# Altium PCB ASCII-v1.1.PcbDoc (part 1 of 2)
Units mil, origin at the board's own origin, x right, y up, seen from the top; angles counter-clockwise.
Board outline 1175 x 6265 mil, 2 copper layers (Top Layer, Bottom Layer), stack 61.811 mil thick; 67 components, 48 nets, 292 pads, 122 vias.
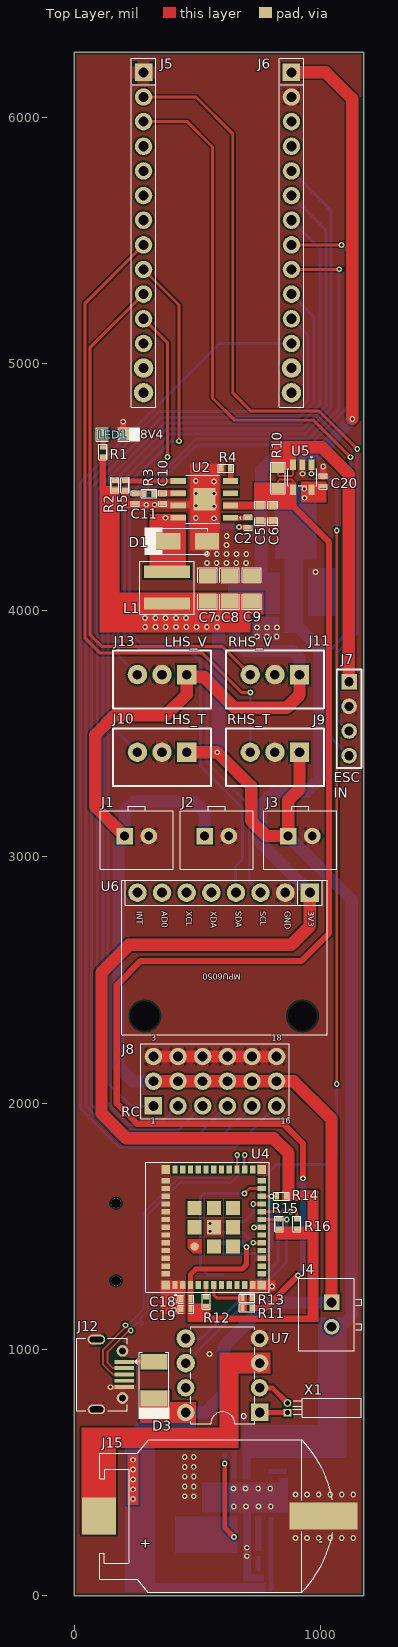
[diagram p0: Top Layer view]
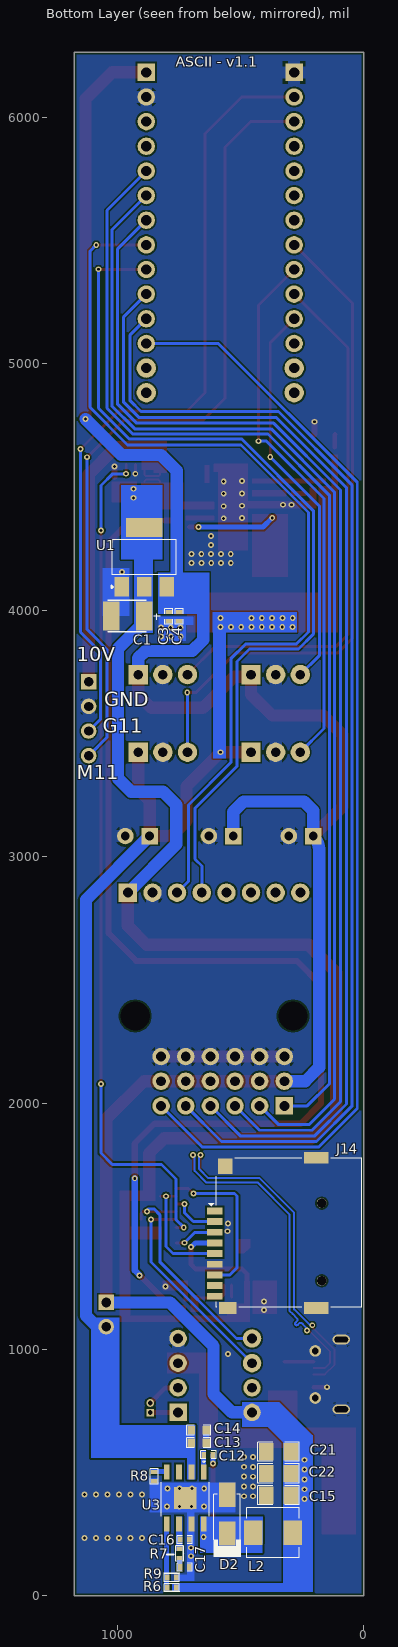
[diagram p1: Bottom Layer view, seen from below]
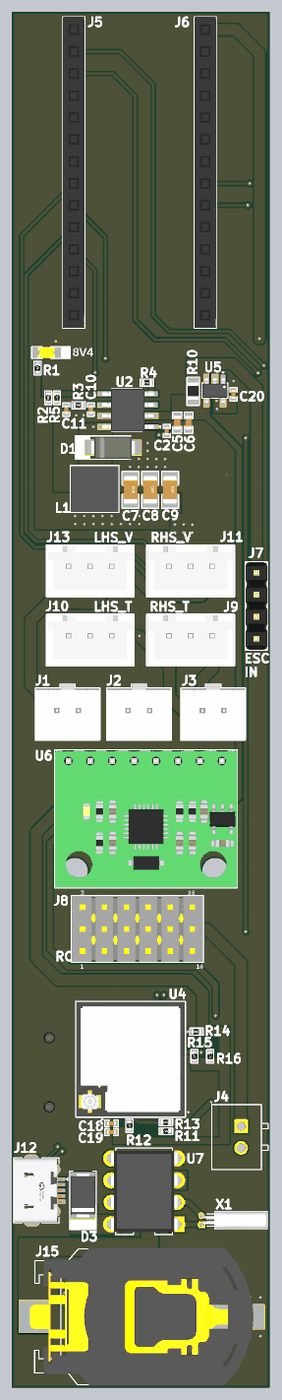
[diagram p2: 3D render of the assembled board from above, using the file's embedded part models]
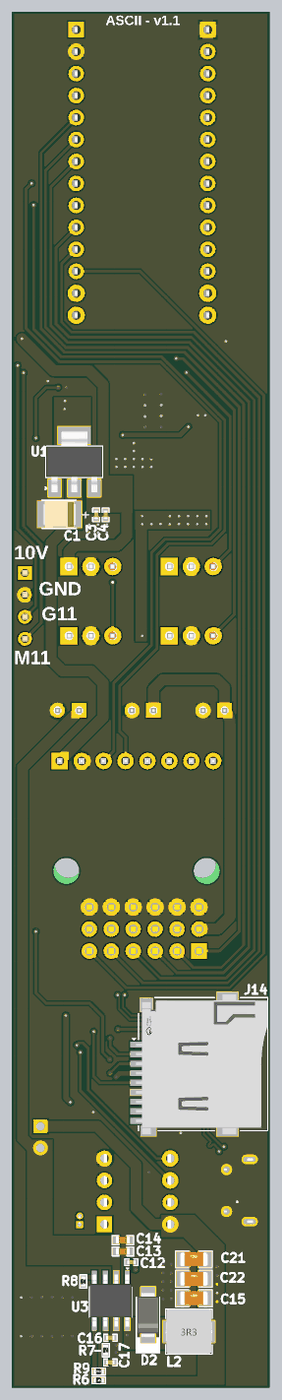
[diagram p3: 3D render of the assembled board from below, using the file's embedded part models]

## Layer stack, top to bottom
Top Solder: solder mask 0.3937, Solder Resist, Dk 3.5
Top Layer: signal copper 1.378
Dielectric 1: core 59.0551, FR-4, Dk 4.8
Bottom Layer: signal copper 1.378
Bottom Solder: solder mask 0.3937, Solder Resist, Dk 3.5

## Board outline
0,5005 0,6265 1175,6265 1175,0 0,0

## Design rules (kind name [scope] priority, off if disabled: settings)
BoardOutlineClearance [All] p1: gap=0 ignorepadtopadclearanceinfootprint=FALSE except(10: Poly-OutlineEdge)
Clearance [All] p1: gap=7 ignorepadtopadclearanceinfootprint=FALSE except(0: Arc-Hole Track-Hole SMDPad-Hole THPad-Hole Via-Hole Fill-Hole Poly-Hole Region-Hole Text-Hole; 4: Arc-SMDPad Track-SMDPad SMDPad-SMDPad)
DiffPairsRouting [InDifferentialPairClass('USB_PROGRAM_LINES')] p1: maxlimit=10 minlimit=10 mostfreqgap=10 toplayer_minwidth=8 toplayer_maxwidth=8 toplayer_prefwidth=8 bottomlayer_minwidth=8 bottomlayer_maxwidth=8 bottomlayer_prefwidth=8 impedanceprofiledriven=TRUE impedanceprofileid={82D3349C-C058-4513-A408-416EB23D566D} impedanceprofilevalue=90.000000 maxuncoupledlength=500
HoleSize [All] p1: absolutevalues=TRUE maxlimit=1000 minlimit=1 maxpercent=80.000 minpercent=20.000
HoleToHoleClearance [All] p1: gap=0 allowstackedmicrovias=TRUE
MatchedLengths "Schematic Matched Net Lengths" [InNetClass('USB_PROGRAM')] p1: tolerance=50 checknetsindiffpair=TRUE checkdiffpairvsdiffpair=FALSE checkxsignals=FALSE checkothers=FALSE
MaxMinImpedance "Schematic Impedance Constraint" [InNetClass('USB_PROGRAM')] p1: minimum=85.00 maximum=90.00
MinimumSolderMaskSliver [All] p1: minsoldermaskwidth=0
PolygonConnect [All] p1: thpad.connectstyle=Relief thpad.reliefconductorwidth=50 thpad.reliefentries=4 thpad.polygonreliefangle="90 Angle" thpad.airgapwidth=10 smdpad.connectstyle=Direct smdpad.reliefconductorwidth=50 smdpad.reliefentries=4 smdpad.polygonreliefangle="90 Angle" smdpad.airgapwidth=10 via.connectstyle=Direct via.reliefconductorwidth=50 via.reliefentries=4 via.polygonreliefangle="90 Angle" via.airgapwidth=10
RoutingVias [All] p1: holewidth=11.81 width=23.62 viastyle="Through Hole" minholewidth=11.81 minwidth=23.62 maxholewidth=11.81 maxwidth=23.62
SilkToSilkClearance [All] p1: silktosilkclearance=0
SilkToSolderMaskClearance [IsPad] p1: minsilkscreentomaskgap=0 clearancetoexposedcopper=TRUE
SolderMaskExpansion [All] p1: expansion=4 istentingtop=FALSE
UnRoutedNet [All] p1: checkbadconnections=TRUE
Width [All] p1: maxlimit=100 minlimit=8 preferedwidth=22
23 further rules are at their usual default settings.

## Classes and differential pairs
differential pair class USB_PROGRAM_LINES: USB_D
net class USB_PROGRAM: USB_D_N USB_D_P
component class Power_Section: C1 C2 C3 C4 C5 C6 C7 C8 C9 C10 C11 C12 C13 C14 C15 C16 C17 C21 C22 D1 D2 J1 J2 J3 J4 L1 L2 LED1 R1 R2 R3 R4 R5 R6 R7 R8 R9 U1 U2 U3
component class Controller_Section: C18 C19 C20 D3 J5 J6 J7 J8 J9 J10 J11 J12 J13 J14 J15 R10 R11 R12 R13 R14 R15 R16 U4 U5 U6 U7 X1
differential pair USB_D: +USB_D_P -USB_D_N

## Components (designator, comment, footprint, x,y, rotation, side; value= is the part's Value field where it differs from the comment)
C1 "22uF" Case-B 957.85,3976.7 r0 bottom locked
C2 "0.1uF" Cap-0402 706,4356 r90 top
C3 "22uF" Cap-0402 790.92,3974.2 r90 bottom locked
C4 "0.1uF" Cap-0402 747.92,3974.2 r90 bottom locked
C5 "4.7uF" Cap-0603 754,4394 r90 top
C6 "4.7uF" Cap-0603 806,4394 r90 top
C7 "47uF" Cap-1206 541,4088 r270 top
C8 "47uF" Cap-1206 631,4088 r270 top
C9 "47uF" Cap-1206 721,4088 r270 top
C10 "6.8pF" Cap-0402 360,4453 r90 top
C11 "5.6nF" Cap-0402 248,4453 r90 top
C12 "0.1uF" Cap-0402 630,572.32 r0 bottom
C13 "4.7uF" Cap-0603 669,621.32 r0 bottom
C14 "4.7uF" Cap-0603 669,672.32 r0 bottom
C15 "47uF" Cap-1206 345,408.32 r180 bottom
C16 "8.2pF" Cap-0402 726,228.32 r0 bottom
C17 "1.8nF" Cap-0402 726,116.32 r0 bottom
C18 "0.1uF" Cap-0402 453.92,1203.7 r180 top locked
C19 "10uF" Cap-0402 453.92,1163.7 r180 top locked
C20 "0.1uF" Cap-0402 1010.92,4522.7 r270 top locked
C21 "47uF" Cap-1206 345,585.32 r180 bottom
C22 "47uF" Cap-1206 345,496.82 r180 bottom
D1 "SS56" SMA 460.74,4280 r0 top
D2 "SS56" SMA 554,332.06 r90 bottom
D3 "SS34-MS" SMA(DO-214AC) 323.92,875.9 r90 top locked
J1 "2.54-2P ZZDK" "2.54-2P ZZDK" 254.12,3083.7 r0 top locked
J2 "2.54-2P ZZDK" "2.54-2P ZZDK" 578.71,3083.7 r0 top locked
J3 "2.54-2P ZZDK" "2.54-2P ZZDK" 917.71,3083.7 r0 top locked
J4 "B2B-XH-2(LF)(SN)" B2B-XH-2(LF)(SN) 1044.92,1141.7 r270 top locked
J5 "PM254-1-14-Z-8.5" "HDR 1x14 TH (Female)" 281.92,5532.7 r270 top locked
J6 "PM254-1-14-Z-8.5" "HDR 1x14 TH (Female)" 881.94,5532.7 r270 top locked
J7 "X6511WV-04H-C60D30" HDR1X4_ 1115.92,3709.7 r270 top locked
J8 "TSW-106-07-T-T" TSW-106-07-T-T 571.92,2088.7 r0 top locked
J9 "B3B-XH-A(LF)(SN)" B3B-XH-A(LF)(SN)_ 764.91,3423.7 r180 top locked
J10 "B3B-XH-A(LF)(SN)" B3B-XH-A(LF)(SN)_ 306.92,3423.7 r180 top locked
J11 "B3B-XH-A(LF)(SN)" B3B-XH-A(LF)(SN)_ 764.91,3738.7 r180 top locked
J12 "HX MICRO XNJ JB" "HX MICRO XNJ JB" 146.92,898.7 r270 top locked
J13 "B3B-XH-A(LF)(SN)" B3B-XH-A(LF)(SN)_ 306.92,3738.7 r180 top locked
J14 "HX TF-CARD H1.8" "HX TF-CARD H1.8" 386.92,1473.7 r90 bottom locked
J15 "BS-CR2032-8" BS-CR2032-8 556.92,323.7 r180 top locked
L1 "8.2nH" YSPIT0550A-8R2M 377,4092.02 r270 top
L2 "2.2uH" PSPMAA0503-2R2M-ANP 368,256.32 r180 bottom
LED1 "150080BS75000" LED-0805 157.92,4712.7 r0 top
R1 "1K" Res-0402 117,4642 r90 top
R2 "115K" Res-0402 166,4507 r270 top
R3 "28.7K" Res-0402 304,4473 r180 top
R4 "105K" Res-0402 616,4576 r0 top
R5 "12.1k" Res-0402 206,4507 r90 top
R6 "60.4K" Res-0402 779,34.32 r180 bottom
R7 "23.7K" Res-0402 747,172.32 r90 bottom
R8 "80.6K" Res-0402 850,484.32 r90 bottom
R9 "11.5K" Res-0402 779,74.32 r0 bottom
R10 "6mR" RES-0805 826.92,4536.7 r90 top locked
R11 "10K" Res-0402 701.92,1168.7 r180 top locked
R12 "10K" Res-0402 535.92,1193.7 r90 top locked
R13 "2K" Res-0402 701.92,1208.7 r180 top locked
R14 "10K" Res-0402 841.92,1621.7 r0 top locked
R15 "10K" Res-0402 831.92,1509.2 r270 top locked
R16 "10K" Res-0402 903.92,1509.2 r270 top locked
U1 "AMS1117-3.3" "SOT- 223" 890.37,4215.78 r180 bottom locked
U2 "TPS54560DDAR" "8-SO PowerPad" 529,4450 r180 top
U3 "TPS54560DDAR" "8-SO PowerPad" 724,397.32 r270 bottom
U4 "ESP32-C3-MINI-1U-H4" ESP32-C3-MINI-1U-H4. 566.92,1495.95 r90 top locked
U5 "ZXCT1086E5TA" SOT-23-5 925.92,4539.7 r270 top locked
U6 "MPU6050 MODULE" MPU6050_ 606.92,2603.7 r180 top locked
U7 "DS1307N" 8-PDIP 602.92,894.7 r180 top locked
X1 "32.768KHz" DT-26 865.92,763.39 r180 top locked

## Footprints (in the part's own frame and the unit in brackets; to place one, negate y for a bottom-side part, rotate by r counter-clockwise, add the part's x,y. Pads: shape width x height; smd on the part's side, far side on the other; paste and mask are expansions set on the pad)
"2.54-2P ZZDK" [mm]
  rect 1.7x1.7 hole 0.9 paste+0 mask+0.051: 1(-1.25,0)
  round 1.7 hole 0.9 paste+0 mask+0.051: 2(1.25,0)
  silkscreen extent -3.75,-3.43 3.75,3.05, body extent -3.75,-3.39 3.75,2.96, height 7
8-PDIP [mm]
  rect 1.8x1.8 hole 1 paste+0 mask+0.051: 1(-3.81,3.81)
  round 1.8 hole 1 paste+0 mask+0.051: 2(-3.81,1.27) 3(-3.81,-1.27) 4(-3.81,-3.81) 7(3.81,1.27) 8(3.81,3.81)
  round 1.905 hole 1 paste+0 mask+0.051: 5(3.81,-3.81) 6(3.81,-1.27)
  silkscreen extent -3.3,-5 3.3,5, body extent -3.92,-4.69 3.92,4.69, height 4.57
"8-SO PowerPad" [mm]
  rect 1.55x0.6 smd mask+0.07: 1(-2.7,1.905) 2(-2.7,0.635) 3(-2.7,-0.635) 4(-2.7,-1.905) 5(2.7,-1.905) 6(2.7,-0.635) 7(2.7,0.635) 8(2.7,1.905)
  rect 2.287x2.287 smd mask+0.07: 9(0,0)
  silkscreen extent -3.76,-2.49 1.9,2.49, body extent -3,-2.45 3,2.45, height 1.7
B2B-XH-2(LF)(SN) [mm]
  rect 1.6x1.6 hole 1 paste+0 mask+0.051: 1(-1.25,0)
  round 1.6 hole 1 paste+0 mask+0.051: 2(1.25,0)
  silkscreen extent -3.75,-3.4 3.74,3.13
B3B-XH-A(LF)(SN)_ [mm]
  rect 2x2 hole 1: 1(-3.81,0)
  round 2 hole 1: 2(-1.27,0) 3(1.27,0)
  silkscreen extent -6.32,-2.46 3.78,3.48, body extent -6.22,-2.36 3.68,3.39, height 7
BS-CR2032-8 [mm]
  rect 7x2.8 smd: 1(-11.575,0)
  rect 3.5x3.8 smd: 2(11.575,0)
  silkscreen extent -12.52,-7.85 11.52,7.85, body extent -13.83,-7.95 12.07,7.95, height 5.41
Cap-0402 [mil]
  rect 18x25 smd mask+2.36: 1(-18.5,0) 2(18.5,0)
  silkscreen extent -31,-16 31,16, body extent -20,-10 20,10, height 19
Cap-0603 [mil]
  rect 30x35 smd mask+2.36: 1(-30,0) 2(30,0)
  silkscreen extent -49,-21 49,21, body extent -32,-16 31,16, height 34
Cap-1206 [mil] "SMD 1206"
  rect 60x70 smd: 1(-50,0) 2(50,0)
  silkscreen extent -84,-39 84,39, body extent -63,-31 63,32, height 39
Case-B [mm]
  rect 1.7x3 smd paste+0: 1(-1.7,0) 2(1.7,0)
  silkscreen extent -3.35,-1.63 2.03,1.63, body extent -1.85,-1.5 1.85,1.5, height 2.16
DT-26 [mm]
  rect 0.8x0.8 hole 0.5 paste+0 mask+0.051: 1(0,0.5)
  round 0.8 hole 0.5 paste+0 mask+0.051: 2(0,-0.5)
  silkscreen extent -7.6,-1 -0.54,1, body extent -7.51,-0.99 0.11,0.99, height 2.02
ESP32-C3-MINI-1U-H4. [mm]
  rect 0.85x0.55 smd paste+0 mask+0.05: 1(-5.95,4) 2(-5.95,3.2) 3(-5.95,2.4) 4(-5.95,1.6) 5(-5.95,0.8) 6(-5.95,0) 7(-5.95,-0.8) 8(-5.95,-1.6) 9(-5.95,-2.4) 10(-5.95,-3.2) 11(-5.95,-4) 25(5.95,-4) 26(5.95,-3.2) 27(5.95,-2.4) 28(5.95,-1.6) 29(5.95,-0.8) 30(5.95,0) 31(5.95,0.8) 32(5.95,1.6) 33(5.95,2.4) 34(5.95,3.2) 35(5.95,4)
  rect 0.55x0.85 smd paste+0 mask+0.05: 12(-4.8,-4.95) 13(-4,-4.95) 14(-3.2,-4.95) 15(-2.4,-4.95) 16(-1.6,-4.95) 17(-0.8,-4.95) 18(0,-4.95) 19(0.8,-4.95) 20(1.6,-4.95) 21(2.4,-4.95) 22(3.2,-4.95) 23(4,-4.95) 24(4.8,-4.95) 36(4.8,4.95) 37(4,4.95) 38(3.2,4.95) 39(2.4,4.95) 40(1.6,4.95) 41(0.8,4.95) 42(0,4.95) 43(-0.8,4.95) 44(-1.6,4.95) 45(-2.4,4.95) 46(-3.2,4.95) 47(-4,4.95) 48(-4.8,4.95)
  rect 1.45x1.45 smd paste+0 mask+0.05: 49(0,0) 54(-1.975,0) 56(0,1.975) 57(1.975,1.975) 58(1.975,0) 59(-1.975,-1.975) 60(0,-1.975) 61(1.975,-1.975)
  rect 0.9x0.9 smd paste+0 mask+0.05: 50(5.95,4.95) 51(5.95,-4.95) 52(-5.95,-4.95) 53(-5.95,4.95)
  round 0.87 smd: 55(-1.975,1.975)
  Top Layer region: -2.7,2.1 -2.1,2.7 -1.25,2.7 -1.25,1.25 -2.7,1.25 -2.7,2.1
  silkscreen extent -6.98,-5.7 6.7,7, body extent -6.6,-5.59 6.6,6.91, height 2.4
HDR1X4_ [mm] "Connector; Header; 4 Position"
  rect 1.6x1.6 hole 0.95: 1(0,0)
  round 1.6 hole 0.95: 2(2.54,0) 3(5.08,0) 4(7.62,0)
  silkscreen extent -1.27,-1.27 8.89,1.27, body extent -1.27,-1.27 8.89,1.27, height 9.5
"HDR 1x14 TH (Female)" [mm]
  rect 1.8x1.8 hole 1.05 paste+0 mask+0.051: 1(-16.51,0)
  round 1.8 hole 1.05 paste+0 mask+0.051: 2(-13.97,0) 3(-11.43,0) 4(-8.89,0) 5(-6.35,0) 6(-3.81,0) 7(-1.27,0) 8(1.27,0) 9(3.81,0) 10(6.35,0) 11(8.89,0) 12(11.43,0)
  round 2 hole 1.05 paste+0 mask+0.051: 13(13.97,0) 14(16.51,0)
  silkscreen extent -17.99,-1.27 17.99,1.27, body extent -17.99,-1.25 17.98,1.25, height 8.8
"HX MICRO XNJ JB" [mm]
  rect 0.4x2 smd paste-100 mask+0.05: 1(-1.3,1.428) 2(-0.65,1.428) 3(0,1.428) 4(0.65,1.428) 5(1.3,1.428)
  oval 1x1.8 hole 0.6 slot 1.4 at 90 deg paste+0 mask+0.05: S1(-3.6,-1.428) S2(3.6,-1.428)
  round 1.2 hole 0.7 paste+0 mask+0.05: S3(2.425,1.252) S4(-2.425,1.252)
  silkscreen extent -3.75,-3.53 3.75,2.79, body extent -3.75,-3.49 3.75,2.07, height 2.57
"HX TF-CARD H1.8" [mm]
  rect 0.7x1.6 smd paste+0 mask+0.05: 1(2.25,5.5) 2(1.15,5.5) 3(0.05,5.5) 4(-1.05,5.5) 5(-2.15,5.5) 6(-3.25,5.5) 7(-4.35,5.5) 8(-5.45,5.5) 9(-6.55,5.5)
  rect 1.2x1.8 smd paste+0 mask+0.05: MP1(-7.75,4.2)
  rect 1.2x2.5 smd paste+0 mask+0.05: MP2(-7.75,-4.95) MP3(7.75,-4.95)
  rect 1.6x1.5 smd paste+0 mask+0.05: MP4(6.85,4.45)
  round 1 hole 1 unplated paste+0: ""(-4.95,-5.5) ""(3.05,-5.5)
  silkscreen extent -7.7,-9.62 7.7,6.18, body extent -8.07,-9.56 8.08,5.64, height 2.06
LED-0805 [mm]
  rect 1.2x1.2 smd: 1(-1.05,0) 2(1.05,0)
  silkscreen extent -1.73,-0.74 2.79,0.74, body extent -1,-0.62 1,0.63, height 1.1
MPU6050_ [mm]
  rect 1.9x1.9 hole 1.021 paste+0 mask+0.102: 1(-8.89,-6.35)
  round 1.9 hole 1.021 paste+0 mask+0.102: 2(-6.35,-6.35) 3(-3.81,-6.35) 4(-1.27,-6.35) 5(1.27,-6.35) 6(3.81,-6.35) 7(6.35,-6.35) 8(8.89,-6.35)
  round 0 hole 3 unplated paste+0 mask+0.102: ""(-8.128,6.35) ""(8.128,6.35)
  silkscreen extent -10.67,-7.62 10.49,8.31, body extent -10.68,-7.62 10.43,8.26, height 8.94
PSPMAA0503-2R2M-ANP [mm]
  rect 1.895x2.5 smd: 1(-2.047,0) 2(2.048,0)
  silkscreen extent -2.7,-2.6 2.7,2.6, body extent -2.7,-2.6 2.7,2.6, height 3.1
Res-0402 [mil]
  rect 18x25 smd mask+2.17: 1(-18.5,0) 2(18.5,0)
  silkscreen extent -32,-17 32,16, body extent -23,-11 23,11, height 16
RES-0805 [mil] "SMD 0805"
  rect 40x50 smd: 1(-40,0) 2(40,0)
  silkscreen extent -64,-29 64,29, body extent -39,-25 39,24, height 24
SMA [mm]
  rect 2.5x1.7 smd: 1(-2,0) 2(2,0)
  silkscreen extent -4.44,-1.42 2.06,1.42, body extent -2.6,-1.3 2.6,1.3, height 2.4
SMA(DO-214AC) [mm]
  rect 1.6x2.8 smd: 1(-1.9,0) 2(1.9,0)
  silkscreen extent -3.99,-1.6 2.84,1.6, body extent -2.6,-1.45 2.6,1.45, height 2.3
SOT-23-5 [mm]
  rect 1.1x0.6 smd: 1(-1.3,0.95) 2(-1.3,0) 3(-1.3,-0.95) 4(1.3,-0.95) 5(1.3,0.95)
  silkscreen extent -2.13,-1.5 0.88,1.5, body extent -1.4,-1.45 1.4,1.45, height 1.45
"SOT- 223" [mm]
  rect 1.5x2 smd: 1(-2.3,-3.05) 2(0,-3.05) 3(2.3,-3.05)
  rect 3.8x2 smd: 4(0,3.05)
  silkscreen extent -3.35,-3.2 3.3,1.8, body extent -3.25,-3.5 3.25,3.5, height 1.61
TSW-106-07-T-T [mm]
  rect 1.8x1.8 hole 1.02: 1(-6.35,-2.54)
  round 1.8 hole 1.02: 2(-6.35,0) 3(-6.35,2.54) 4(-3.81,-2.54) 5(-3.81,0) 6(-3.81,2.54) 7(-1.27,-2.54) 8(-1.27,0) 9(-1.27,2.54) 10(1.27,-2.54) 11(1.27,0) 12(1.27,2.54) 13(3.81,-2.54) 14(3.81,0) 15(3.81,2.54) 16(6.35,-2.54) 17(6.35,0) 18(6.35,2.54)
  silkscreen extent -7.67,-3.86 7.67,3.86, body extent -7.62,-3.81 7.62,3.81, height 8.38
YSPIT0550A-8R2M [mm]
  rect 1.25x4.7 smd: 1(-1.625,0) 2(1.625,0)
  silkscreen extent -2.72,-2.79 2.73,2.83, body extent -2.65,-2.75 2.65,2.75, height 4.5

## Part data
C1: library part TAJB226K016RNJ, "CAP TANT 22UF 10% 16V 1411", LCSC Part Number=C8020, Manufacturer="Kyocera AVX", Package=CASE-B-3528, ComponentLink1Description=LCSC, ComponentLink1URL=https://www.lcsc.com/product-detail/Tantalum-Capacitors_Kyocera-AVX-TAJB226K016RNJ_C8020.html, Item Type="Tantalum Capacitor", Manufacturer Part Number=TAJB226K016RNJ
C2 C4 C12 C18 C20: library part CC0402KRX7R8BB104, "CAP CER 0.1UF 25V X7R 0402", Capacitance=100nF, Case Code (Imperial)=0402, Case Code (Metric)=1005, Dielectric=X7R, LCSC Part Number=C105883, Manufacturer=Yageo, Max Operating Temperature=125°C, Min Operating Temperature=-55°C, Resistor Type=Ceramic, Supplier Part Number 1=311-2077-1-ND, Tolerance=10%, Voltage Rating=25V, Case/Package=0402, Category="Ceramic Capacitors", ComponentLink1Description=https://datasheet.ciiva.com/11464/upy-gphc-x7r-6-3v-to-50v-8-11464889.pdf?src-supplier=Avnet, ComponentLink1URL=https://datasheet.ciiva.com/11464/upy-gphc-x7r-6-3v-to-50v-8-11464889.pdf?src-supplier=Avnet, ComponentLink2Description=https://datasheet.ciiva.com/13210/upy-gphc-x7r-6-3v-to-50v-8-12304-13210908.pdf?src-supplier=Mouser, ComponentLink2URL=https://datasheet.ciiva.com/13210/upy-gphc-x7r-6-3v-to-50v-8-12304-13210908.pdf?src-supplier=Mouser, ComponentLink3Description=https://datasheet.ciiva.com/17437/upy-gphc-x7r-6-3v-to-50v-8-17437357.pdf?src-supplier=Avnet+Europe, ComponentLink3URL=https://datasheet.ciiva.com/17437/upy-gphc-x7r-6-3v-to-50v-8-17437357.pdf?src-supplier=Avnet+Europe, Depth=0.5mm, Dissipation Factor=3.5%, Halogen Free="Halogen Free", Height=0.5mm, Lead Free="Lead Free", Length=1mm, Manufacturer Part Number=CC0402KRX7R8BB104, Mount="Surface Mount", Packaging="Tape and Reel", Pricing 1="1=0.10000, 10=0.03100, 50=0.01700, 100=0.01390, 500=0.00990, 1000=0.00777, 2500=0.00707, 5000=0.00650 (USD)", Radiation Hardening=No, RoHS=Yes, Stock 1=1841009, Supplier 1=Digi-Key, Termination=SMD/SMT, Thickness=0.022inch, Voltage Rating (DC)=25V, Width=0.02inch
C3: library part GRM158R61A226ME15D, "CAP CER 22UF 10V X5R 0402", Case/Package=343Case, Dielectric=1537DielectricType, LCSC Part Number=C3845593, Manufacturer=Murata, Max Operating Temperature=85°C, Min Operating Temperature=-55°C, Supplier Part Number=81-GRM158R61A226ME5D, Tolerance=20%, Voltage Rating=10V, Category="Ceramic Capacitors", Height=800um, Item Type=Capacitor, Length=1mm, Manufacturer Part Number=GRM158R61A226ME15D, Material=4241ConductorMaterial, Pricing="1=0.46, 10=0.225, 50=0.225, 100=0.146, 1000=0.124, 10000=0.106 (USD)", RoHS=Yes, Stock=328944, Supplier=Mouser, Thickness=800um, Voltage Rating (DC)=10V, Width=500um
C5 C6 C13 C14: library part GRM188R61E475KE11D, "CAP CER 4.7UF 25V X5R 0603", Case Code (Imperial)=0603, Case Code (Metric)=1608, Dielectric=X5R, LCSC Part Number=C90057, Manufacturer=Murata, Max Operating Temperature=85°C, Min Operating Temperature=-55°C, Package Quantity=4000, Supplier Part Number 1=490-7203-1-ND, Tolerance=10%, Voltage=25V, Capacitance=4.7uF, Case/Package=0603, ComponentLink1Description=http://www.farnell.com/datasheets/2048165.pdf?src-supplier=Element14, ComponentLink1URL=http://www.farnell.com/datasheets/2048165.pdf?src-supplier=Element14, ComponentLink2Description=https://www.murata.com/~/media/webrenewal/support/library/catalog/products/capacitor/mlcc/c02e.ashx?la=en-us&src-supplier=Digi-Key, ComponentLink2URL=https://www.murata.com/~/media/webrenewal/support/library/catalog/products/capacitor/mlcc/c02e.ashx?la=en-us&src-supplier=Digi-Key, Depth=0.8mm, Height=0.8mm, Lead Free="Lead Free", Length=1.6mm, Manufacturer Part Number=GRM188R61E475KE11D, Material=Ceramic, Mount="Surface Mount", Packaging="Cut Tape", Pricing 1="1=0.37, 10=0.258, 100=0.1549, 500=0.1162, 1000=0.09812 (USD)", REACH SVHC="No SVHC", Stock 1=71618, Supplier 1=Digi-Key, Thickness=0.031inch, Voltage Rating=25V, Voltage Rating (DC)=25V, Width=0.031inch
C7 C8 C9 C15 C21 C22: library part GRM31CR61E476ME44L, "CAP CER 47UF 25V X5R 1206", Dielectric=X5R, LCSC Part Number=C403725, Manufacturer=Murata, Supplier Part Number 1=490-16268-2-ND, Tolerance=20%, Voltage Rating (DC)=25V, Capacitance=47uF, Category="Ceramic Capacitors", ComponentLink1Description=https://search.murata.co.jp/Ceramy/image/img/A01X/partnumbering_e_01.pdf?src-supplier=Digi-Key, ComponentLink1URL=https://search.murata.co.jp/Ceramy/image/img/A01X/partnumbering_e_01.pdf?src-supplier=Digi-Key, Item Type=Capacitor, Length=3.2mm, Manufacturer Part Number=GRM31CR61E476ME44L, RoHS=Yes, Supplier 1=Digi-Key, Thickness=1.6mm, Width=1.6mm
C10: library part CC0402CRNPO9BN6R8, "CAP CER 6.8PF 50V C0G/NPO 0402", Case Code (Imperial)=0402, Case Code (Metric)=1005, Dielectric=C0G, Insulation Resistance=10GR, LCSC Part Number=C189470, Manufacturer=Yageo, Max Operating Temperature=125°C, Min Operating Temperature=-55°C, Supplier Part Number=3247368, Tolerance=2%, Voltage Rating=50V, Case/Package=0402, Category="Ceramic Capacitors", ComponentLink1Description=https://datasheet.ciiva.com/11587/upy-gp-np0-16v-to-50v-8-11587182.pdf?src-supplier=Avnet, ComponentLink1URL=https://datasheet.ciiva.com/11587/upy-gp-np0-16v-to-50v-8-11587182.pdf?src-supplier=Avnet, Construction=Flat, Depth=0.5mm, Height=0.5mm, Item Type=Capacitor, Length=1mm, Manufacturer Part Number=CC0402CRNPO9BN6R8, Mounting Technology="Surface Mount", Packaging="Tape and Reel", Pricing="10000=0.0024, 40000=0.0022, 150000=0.0021, 400000=0.002, 1000000=0.0019 (USD)", Radiation Hardening=No, RoHS=Yes, RoHS Compliant=Yes, Series=CC, Stock=200000, Supplier="Future Electronics", Termination=SMD/SMT, Voltage Rating (DC)=50V, Weight=2.3E-05oz, Width=0.5mm
C11: library part CC0402KRX7R9BB562, "CAP CER 5600PF 50V X7R 0402", LCSC Part Number=C281760, Manufacturer=Yageo, Temperature Coefficient=30ppm/°C, ComponentLink1Description=https://datasheet.ciiva.com/26862/getdatasheetpartid-403477-26862651.pdf?src-supplier=Verical, ComponentLink1URL=https://datasheet.ciiva.com/26862/getdatasheetpartid-403477-26862651.pdf?src-supplier=Verical, ComponentLink2Description=https://datasheet.ciiva.com/11586/upy-gphc-x7r-6-3v-to-50v-8-11586494.pdf?src-supplier=Avnet, ComponentLink2URL=https://datasheet.ciiva.com/11586/upy-gphc-x7r-6-3v-to-50v-8-11586494.pdf?src-supplier=Avnet, Halogen Free=5694HalogenFree, Height=550um, Item Type=Capacitors, Lead Free=5697LeadFree, Manufacturer Part Number=CC0402KRX7R9BB562, Material=4241ConductorMaterial, Pricing="10000=0.0029, 40000=0.0028, 150000=0.0027, 300000=0.0026, 750000=0.0025 (USD)", RoHS=Yes, Stock=120000, Supplier="Future Electronics"
C16: library part CC0402DRNPO9BN8R2, "CAP CER 8.2PF 50V C0G/NPO 0402", LCSC Part Number=C327412, Manufacturer=Yageo, Supplier Part Number=2138063, Category="Ceramic Capacitors", ComponentLink1Description=https://datasheet.ciiva.com/144/mlccorderingcode-144589.pdf?src-supplier=Digikey, ComponentLink1URL=https://datasheet.ciiva.com/144/mlccorderingcode-144589.pdf?src-supplier=Digikey, ComponentLink2Description=https://datasheet.ciiva.com/144/mlccorderingcode-144590.pdf?src-supplier=Digikey, ComponentLink2URL=https://datasheet.ciiva.com/144/mlccorderingcode-144590.pdf?src-supplier=Digikey, ComponentLink3Description=https://datasheet.ciiva.com/144/mlccorderingcode-144591.pdf?src-supplier=Digikey, ComponentLink3URL=https://datasheet.ciiva.com/144/mlccorderingcode-144591.pdf?src-supplier=Digikey, ComponentLink4Description=https://datasheet.ciiva.com/13208/upy-gp-np0-16v-to-50v-8-13208987.pdf?src-supplier=Mouser, ComponentLink4URL=https://datasheet.ciiva.com/13208/upy-gp-np0-16v-to-50v-8-13208987.pdf?src-supplier=Mouser, ComponentLink5Description=https://datasheet.ciiva.com/11587/upy-gp-np0-16v-to-50v-8-11587051.pdf?src-supplier=Avnet, ComponentLink5URL=https://datasheet.ciiva.com/11587/upy-gp-np0-16v-to-50v-8-11587051.pdf?src-supplier=Avnet, Item Type=Capacitor, Manufacturer Part Number=CC0402DRNPO9BN8R2, Pricing="10000=0.0024, 40000=0.0022, 150000=0.0021, 400000=0.002, 1000000=0.0019 (USD)", RoHS=Yes, Stock=120000, Supplier="Future Electronics"
C17: library part CC0402KRX7R9BB182, "50V 1.8nF X7R ±10% 0402 Multilayer Ceramic Capacitors MLCC - SMD/SMT ROHS", LCSC Part Number=C107024, Manufacturer=YAGEO, Package=0402, ComponentLink1Description=LCSC, ComponentLink1URL=https://www.lcsc.com/product-detail/Multilayer-Ceramic-Capacitors-MLCC-SMD-SMT_YAGEO-CC0402KRX7R9BB182_C107024.html, Item Type=Capacitor, Manufacturer Part Number=CC0402KRX7R9BB182
C19: library part CL05A106MP5NUNC, "CAP CER 10UF 10V X5R 0402", Case Code (Imperial)=0402, Case Code (Metric)=1005, Dielectric=X5R, LCSC Part Number=C315248, Manufacturer=Samsung, Max Operating Temperature=85°C, Min Operating Temperature=-55°C, Package Quantity=1, Tolerance=20%, Voltage Rating=10V, Capacitance=10uF, Case/Package=0402, Category="Ceramic Capacitors", ComponentLink1Description=https://datasheet.ciiva.com/25721/cl05a106mp5nunc-25721584.pdf?src-supplier=Digi-Key, ComponentLink1URL=https://datasheet.ciiva.com/25721/cl05a106mp5nunc-25721584.pdf?src-supplier=Digi-Key, ComponentLink2Description=https://datasheet.ciiva.com/26838/getdatasheetpartid-745310-26838170.pdf?src-supplier=Verical, ComponentLink2URL=https://datasheet.ciiva.com/26838/getdatasheetpartid-745310-26838170.pdf?src-supplier=Verical, Construction=Flat, Contact Plating=Tin, Depth=0.5mm, Item Type=Capacitor, Lead Free="Lead Free", Length=1mm, Manufacturer Part Number=CL05A106MP5NUNC, Mount="Surface Mount", Packaging="Tape and Reel", Pricing 1="10000=0.02537 (USD)", Radiation Hardening=No, RoHS=Yes, RoHS Compliant=Yes, Series=CL, Stock 1=1729850, Supplier 1=Avnet, Supplier Part Number 1=CL05A106MP5NUNC, Termination=Wraparound, Thickness=0.028inch, Width=0.02inch
D1 D2: "DIODE SCHOTTKY 60V 5A SMA", LCSC Par Number=C65009, Manufacturer=MDD, ComponentLink1Description=LCSC, ComponentLink1URL=https://www.lcsc.com/product-detail/Schottky-Barrier-Diodes-SBD_MDD-Microdiode-Electronics-SS56_C65009.html, Iterm Type=Diode, Manufacturer Part Number=SS56
D3: "40V 3A 550mV@3A SMA(DO-214AC) Schottky Diodes ROHS", LCSC Part Number=C2836396, Manufacturer=MSKSEMI, Package=SMA(DO-214AC), ComponentLink1Description=LCSC, ComponentLink1URL=https://www.lcsc.com/product-detail/Schottky-Diodes_MSKSEMI-SS34-MS_C2836396.html, Item Type=Diode, Manufacturer Part Number=SS34-MS
J1 J2 J3: "1x2P 2P XH 1 2.5mm Tin 2 -25℃~+85℃ Brass 3A Direct Insert Plugin,P=2.5mm Wire To Board Connector ROHS", LCSC Part Number=C18185649, Manufacturer="SHOU HAN", Package=Plugin,P=2.5mm, ComponentLink1Description=LCSC, ComponentLink1URL=https://www.lcsc.com/product-detail/Wire-To-Board-Connector_SHOU-HAN-2-54-2P-ZZDK_C18185649.html, Item Type="Wire To Board Connector", Manufacturer Part Number="2.54-2P ZZDK"
J4: "CONN HEADER VERT 2POS 2.5MM", Flammability Rating="UL94 V-0", Insulation Color=Natural, Manufacturer=JST, Max Operating Temperature=85°C, Min Operating Temperature=-25°C, Voltage Rating=250V, Connector Type=Header, Contact Finish - Mating=TIN, Contact Material=Brass, Contact Shape=Square, Contact Type="Male Pin", Fastening Type=Detent, Insulation Material=Nylon, Item Type=Headers, LCSC Part Number=B2B-XH-2(LF)(SN), Manufacturer Part Number=B2B-XH-2(LF)(SN), Mounting Technology="Through Hole", Number of Positions=2, Number of Rows=1, Packaging=Bulk, Pricing="1=0.0936, 10=0.0911, 25=0.0894, 50=0.0861, 100=0.0835, 1000=0.0764 (USD)", RoHS=Yes, Series=XH, Stock=480, Supplier="Arrow Electronics", Termination=Press-Fit
J5 J6: "2.54mm Single Row 3A Brass Alloy 14P -40℃~+105℃ 260℃@5S Direct Insert 1x14P 8.5mm Top Square Hole Plugin,P=2.54mm Female Headers ROHS", LCSC Part Number=C2897377, Manufacturer=HCTL, Package=Plugin,P=2.54mm, ComponentLink1Description=LCSC, ComponentLink1URL=https://www.lcsc.com/product-detail/Female-Headers_HCTL-PM254-1-14-Z-8-5_C2897377.html, Item Type="Female Header", Manufacturer Part Number=PM254-1-14-Z-8.5
J7: "Gold 250V 3A Straight Square Pins 2.5mm 4P 260℃ 6mm -40℃~+105℃ 3mm 2.54mm Plugin Black Brass 1x4P Plugin,P=2.54mm Pin Headers ROHS", LCSC Part Number=C706876, Manufacturer=XKB, Package=Plugin,P=2.54mm, ComponentLink1Description=LCSC, ComponentLink1URL=https://www.lcsc.com/product-detail/Pin-Headers_XKB-Connectivity-X6511WV-04H-C60D30_C706876.html, Item Type="Male Header", Manufacturer Part Number=X6511WV-04H-C60D30
J8: "CONN HEADER VERT 18POS 2.54MM", LCSC Part Number=C5967361, Manufacturer=Samtec, ComponentLink1Description=http://www.samtec.com/ftppub/pdf/htsw_th.pdf?src-supplier=Avnet, ComponentLink1URL=http://www.samtec.com/ftppub/pdf/htsw_th.pdf?src-supplier=Avnet, ComponentLink2Description=https://datasheet.octopart.com/TSW-106-07-T-T-Samtec-datasheet-97325576.pdf?src-supplier=Sager+Electronics, ComponentLink2URL=https://datasheet.octopart.com/TSW-106-07-T-T-Samtec-datasheet-97325576.pdf?src-supplier=Sager+Electronics, Item Type=Connectors, Manufacturer Part Number=TSW-106-07-T-T, RoHS=Yes, Stock=1529, Supplier="Arrow Electronics"
J9 J10 J11 J13: "CONN HEADER VERT 3POS 2.5MM", Color=Natural, Contact Resistance=20mR, Current Rating=3A, Housing Color=White, Insulation Resistance=1GR, LCSC Part Number=C144394, Manufacturer=JST, Max Operating Temperature=85°C, Max Voltage Rating (AC)=250V, Min Operating Temperature=-25°C, Supplier Part Number 1=1516277, Category="Headers and Wire Housings", ComponentLink1Description=https://datasheet.ciiva.com/26894/getdatasheetpartid-640434-26894454.pdf?src-supplier=Verical, ComponentLink1URL=https://datasheet.ciiva.com/26894/getdatasheetpartid-640434-26894454.pdf?src-supplier=Verical, ComponentLink2Description=https://datasheet.ciiva.com/11746/0900766b8082653f-11746520.pdf?src-supplier=RSComponents, ComponentLink2URL=https://datasheet.ciiva.com/11746/0900766b8082653f-11746520.pdf?src-supplier=RSComponents, ComponentLink3Description=https://datasheet.ciiva.com/26894/getdatasheetpartid-440399-26894778.pdf?src-supplier=Verical, ComponentLink3URL=https://datasheet.ciiva.com/26894/getdatasheetpartid-440399-26894778.pdf?src-supplier=Verical, Connector Type="Male Pin", Contact Material=Brass, Contact Plating=Tin,Lead,Copper, Depth=5.75mm, Fastening Type=Detent, Gender=Male, Housing Material=Polyamide, Item Type="JST Connector", Lead Free="Lead Free", Lead Pitch=2.5mm, Length=9.9mm, Manufacturer Part Number=B3B-XH-A(LF)(SN), Max Current Rating=3A, Max Voltage Rating (DC)=250V, Mount="Through Hole", Number of Contacts=3, Number of Positions=3, Number of Rows=1, Orientation=Straight, Packaging=Bulk, Pitch=2.5mm, Pricing 1="100=0.09250, 500=0.07700, 1000=0.06470, 2500=0.06340, 5000=0.06210, 10000=0.06080 (GBP)", REACH SVHC="No SVHC", RoHS=Yes, Stock 1=114254, Supplier 1=Farnell, Termination=Press-Fit, Voltage Rating=250V, Voltage Rating (AC)=250V, Wire/Cable Gauge=22AWG
J12: "Female Micro-B SMD USB Connectors ROHS", LCSC Part Number=C5160305, Manufacturer=HANXIA, Package=Custom, ComponentLink1Description=LCSC, ComponentLink1URL=https://www.lcsc.com/product-detail/USB-Connectors_hanxia-HX-MICRO-XNJ-JB_C5160305.html, Item Type="Micro-B Connector", Manufacturer Part Number="HX MICRO XNJ JB"
J14: "-40℃~+70℃ 1.8mm Gold Card Slot MicroSD card (TF card) Brass Alloy Self-bouncing SMD SD Card / Memory Card Connector ROHS", LCSC Part Number=C19189036, Manufacturer=hanxia, Card Connection Mode=Pluggable, ComponentLink1Description=LCSC, ComponentLink1URL=https://www.lcsc.com/product-detail/SD-Card-Memory-Card-Connector_hanxia-HX-TF-CARD-H1-8_C19189036.html, Item Type=MicroSD, Manufacturer Part Number="HX TF-CARD H1.8"
J15: "Battery holder -40℃~+85℃ Gold Copper end CR2032 SMD Button And Strip Battery Connector ROHS", LCSC Part Number=C7498149, Manufacturer="Lian Xin Technology", Package=SMD, ComponentLink1Description=LCSC, ComponentLink1URL=https://www.lcsc.com/product-detail/Button-And-Strip-Battery-Connector_Lian-Xin-Technology-BS-CR2032-8_C7498149.html, Item Type="Cell Holder", Manufacturer Part Number=BS-CR2032-8
L1: library part YSPIT0550A-8R2M, "8.2uH ±20% 7.2A SMD,5.5x5.3mm Power Inductors ROHS", LCSC Part Number=C18236292, Manufacturer=YJYCOIN, Item Type=Inductors, Manufacturer Part Number=YSPIT0550A-8R2M, Supplier=LCSC
L2: library part PSPMAA0503-2R2M-ANP, "5.5A 2.2uH ±20% 7.5A SMD,5.2x5.4x3mm Power Inductors ROHS", LCSC Part Number=C436533, Manufacturer="PROD Tech", Package=SMD,5.2x5.4x3mm, ComponentLink1Description=LCSC, ComponentLink1URL=https://www.lcsc.com/product-detail/Power-Inductors_PROD-Tech-PSPMAA0503-2R2M-ANP_C436533.html, Item Type=Inductor, Manufacturer Part Number=PSPMAA0503-2R2M-ANP
LED1: "LED BLUE CLEAR 0805 SMD", Case Code (Imperial)=0805, Case Code (Metric)=2012, Color=Blue, Forward Current=30mA, Forward Voltage=3.2V, Lens Color=Colorless, Manufacturer="Wurth Electronics", Max Operating Temperature=85°C, Max Reverse Voltage (DC)=5V, Min Operating Temperature=-40°C, Package Quantity=1, Power Dissipation=105mW, Supplier Part Number=732-4982-1-ND, Test Current=20mA, Case/Package=0805, ComponentLink1Description=https://datasheet.ciiva.com/22656/1740214-22656954.pdf?src-supplier=Element14, ComponentLink1URL=https://datasheet.ciiva.com/22656/1740214-22656954.pdf?src-supplier=Element14, ComponentLink2Description=https://datasheet.ciiva.com/23843/150080bs75000-23843251.pdf?src-supplier=Newark, ComponentLink2URL=https://datasheet.ciiva.com/23843/150080bs75000-23843251.pdf?src-supplier=Newark, ComponentLink3Description=https://datasheet.ciiva.com/29279/759433-da-01-en-chipled-0805-w-kl-blau-150080bs75000-29279203.pdf?src-supplier=Conrad, ComponentLink3URL=https://datasheet.ciiva.com/29279/759433-da-01-en-chipled-0805-w-kl-blau-150080bs75000-29279203.pdf?src-supplier=Conrad, ComponentLink4Description=https://datasheet.ciiva.com/29562/150080bs75000-29562923.pdf?src-supplier=Digikey, ComponentLink4URL=https://datasheet.ciiva.com/29562/150080bs75000-29562923.pdf?src-supplier=Digikey, ComponentLink5Description=https://datasheet.ciiva.com/29562/150080bs75000-29562922.pdf?src-supplier=Digikey, ComponentLink5URL=https://datasheet.ciiva.com/29562/150080bs75000-29562922.pdf?src-supplier=Digikey, Dominant Wavelength=470nm, Height=0.8mm, Item Type=LEDs, Lead Free="Lead Free", Length=2mm, Lens Size=1.25mm, Lens Style=Clear,Flat,Rectangular, Lens Transparency=Clear, Luminous Intensity=145mcd, Manufacturer Part Number=150080BS75000, Mounting Technology="Surface Mount", Packaging="Cut Tape", Pricing="1=0.18, 50=0.176, 100=0.151, 500=0.131 (USD)", Reach SVHC Compliant=Unknown, Reverse Voltage=5V, RoHS=Yes, RoHS Compliant=Yes, Series=WL-SMCW, Stock=93649, Supplier=Digikey, Viewing Angle=140°, Wavelength=470nm, Width=1.25mm
R1: library part RC0402JR-071KL, "RES 1K OHM 5% 1/16W 0402", Case Code (Imperial)=0402, Case Code (Metric)=1005, LCSC Part Number=C105637, Manufacturer=Yageo, Max Operating Temperature=155°C, Max Power Dissipation=63mW, Min Operating Temperature=-55°C, Package Quantity=1, Power Rating=62.5mW, Resistance=1kR, Resistance Tolerance=5%, Resistor Type="Thick Film", Supplier Part Number 1=311-1.0KJRCT-ND, Temperature Coefficient=100ppm/°C, Voltage Rating=50V, Case/Package=0402, Category="Chip SMD Resistors", ComponentLink1Description=https://datasheet.ciiva.com/7983/1018594-7983558.pdf?src-supplier=Element14, ComponentLink1URL=https://datasheet.ciiva.com/7983/1018594-7983558.pdf?src-supplier=Element14, ComponentLink2Description=https://datasheet.ciiva.com/2452/pyu-r-int-thick-7-2452756.pdf?src-supplier=Digi-Key, ComponentLink2URL=https://datasheet.ciiva.com/2452/pyu-r-int-thick-7-2452756.pdf?src-supplier=Digi-Key, ComponentLink3Description=https://datasheet.ciiva.com/2452/pyu-r-int-thick-7-2452757.pdf?src-supplier=Digi-Key, ComponentLink3URL=https://datasheet.ciiva.com/2452/pyu-r-int-thick-7-2452757.pdf?src-supplier=Digi-Key, ComponentLink4Description=https://datasheet.ciiva.com/2452/pyu-r-int-thick-7-2452755.pdf?src-supplier=Digi-Key, ComponentLink4URL=https://datasheet.ciiva.com/2452/pyu-r-int-thick-7-2452755.pdf?src-supplier=Digi-Key, ComponentLink5Description=https://datasheet.ciiva.com/7850/1018594-7850170.pdf?src-supplier=Element14, ComponentLink5URL=https://datasheet.ciiva.com/7850/1018594-7850170.pdf?src-supplier=Element14, ComponentLink6Description=https://datasheet.ciiva.com/7850/1018594-7850171.pdf?src-supplier=Element14, ComponentLink6URL=https://datasheet.ciiva.com/7850/1018594-7850171.pdf?src-supplier=Element14, ComponentLink7Description=https://datasheet.ciiva.com/17081/pyu-rc0402-51-rohs-l-6-r-17081438.pdf?src-supplier=Future+Electronics, ComponentLink7URL=https://datasheet.ciiva.com/17081/pyu-rc0402-51-rohs-l-6-r-17081438.pdf?src-supplier=Future+Electronics, Construction=Rectangular, Depth=0.5mm, Features="Moisture Resistant", Height=0.016inch, Item Type=Resistor, Lead Free="Lead Free", Length=0.039inch, Manufacturer Part Number=RC0402JR-071KL, Military Standard=Not, Number of Terminations=2, Packaging="Tape and Reel", Pricing 1="1=0.10000, 10=0.01300, 100=0.00540, 1000=0.00244, 2500=0.00212, 5000=0.00175 (USD)", REACH SVHC="No SVHC", RoHS=Yes, RoHS Compliant=Yes, Series=RC, Size Code=0402, Stock 1=452315, Supplier 1=Digi-Key, Termination=SMD/SMT, Tolerance=5%, Width=0.02inch
R2: library part CR0402FF1153G, "62.5mW Thick Film Resistors 50V ±1% ±200ppm/℃ 115kΩ 0402 Chip Resistor - Surface Mount ROHS", LCSC Part Number=C100215, Manufacturer="LIZ Elec", Package=0402, ComponentLink1Description=LCSC, ComponentLink1URL=https://www.lcsc.com/product-detail/Chip-Resistor-Surface-Mount_LIZ-Elec-CR0402FF1153G_C100215.html, Item Type=Resistor, Manufacturer Part Number=CR0402FF1153G
R3: library part NQ02WGF2872TCE, "62.5mW 100V ±1% 28.7kΩ 0402 Chip Resistor - Surface Mount ROHS", LCSC Part Number=C2779810, Manufacturer="Royal Ohm", Supplier Part Number=303-NQ02WGF2872TCE, Item Type=Resistor, Manufacturer Part Number=NQ02WGF2872TCE, Pricing="10000=0.002 (USD)", Supplier=Mouser
R4: library part RTT021053FTH, "62.5mW Thick Film Resistors 50V ±100ppm/℃ ±1% 105kΩ 0402 Chip Resistor - Surface Mount ROHS", LCSC Part Number=C102762, Manufacturer=RALEC, Package=0402, ComponentLink1Description=LCSC, ComponentLink1URL=https://www.lcsc.com/product-detail/Chip-Resistor-Surface-Mount_RALEC-RTT021053FTH_C102762.html, Item Type=Resistor, Manufacturer Part Number=RTT021053FTH
R5: library part RT0402BRD0712K1L, "RES SMD 12.1KOHM 0.1% 1/16W 0402", LCSC Part Number=C281773, Manufacturer=Yageo, Supplier Part Number=2068365, Category="Chip SMD Resistors", ComponentLink1Description=https://datasheet.ciiva.com/12812/pyu-rt-1-to-0-05-rohs-l-4-12812462.pdf?src-supplier=Mouser, ComponentLink1URL=https://datasheet.ciiva.com/12812/pyu-rt-1-to-0-05-rohs-l-4-12812462.pdf?src-supplier=Mouser, Item Type=Resistor, Manufacturer Part Number=RT0402BRD0712K1L, Pricing="10000=0.0245, 20000=0.0217, 30000=0.0237, 50000=0.0233, 100000=0.0228, 200000=0.022 (USD)", RoHS=Yes, Stock=60000, Supplier="Future Electronics"
R6: library part SCR0402F60K4, "60.4kΩ 50V 62.5mW Thick Film Resistors ±1% 0402 Chip Resistor - Surface Mount ROHS", LCSC Part Number=C3016055, Manufacturer=VO, Package=0402, ComponentLink1Description=LCSC, ComponentLink1URL=https://www.lcsc.com/product-detail/Chip-Resistor-Surface-Mount_VO-SCR0402F60K4_C3016055.html, Item Type=Resistor, Manufacturer Part Number=SCR0402F60K4
R7: library part RT0402BRD0723K7L, "RES SMD 23.7KOHM 0.1% 1/16W 0402", LCSC Part Number=C852656, Manufacturer=Yageo, Supplier Part Number=YAG4212CT-ND, Voltage Rating (DC)=50V, Category="Chip SMD Resistors", ComponentLink1Description=https://datasheet.ciiva.com/2582/pyu-rt-1-to-0-05-rohs-l-5-2582244.pdf?src-supplier=Digikey, ComponentLink1URL=https://datasheet.ciiva.com/2582/pyu-rt-1-to-0-05-rohs-l-5-2582244.pdf?src-supplier=Digikey, ComponentLink2Description=https://datasheet.ciiva.com/12725/pyu-rt-1-to-0-05-rohs-l-4-12725336.pdf?src-supplier=Mouser, ComponentLink2URL=https://datasheet.ciiva.com/12725/pyu-rt-1-to-0-05-rohs-l-4-12725336.pdf?src-supplier=Mouser, Item Type=Resistor, Manufacturer Part Number=RT0402BRD0723K7L, Pricing="1=0.16, 10=0.121, 50=0.0958, 100=0.0859, 500=0.0654, 1000=0.0578, 5000=0.04283 (USD)", RoHS=Yes, Stock=28530, Supplier=Digikey
R8: library part CRCW040280K6FKED, "RES SMD 80.6K OHM 1% 1/16W 0402", LCSC Part Number=C2076816, Manufacturer="Vishay Intertech", Package=Res-0402, Item Type=Resistor, Manufacturer Part Number=CRCW040280K6FKED
R9: library part FRC0402F1152TS, "11.5kΩ 50V 62.5mW Thick Film Resistors ±100ppm/℃ ±1%  0402 Chip Resistor - Surface Mount ROHS", LCSC Part Number=C2933068, Manufacturer=FOJAN, Package=0402, ComponentLink1Description=LCSC, ComponentLink1URL=https://www.lcsc.com/product-detail/Chip-Resistor-Surface-Mount_FOJAN-FRC0402F1152TS_C2933068.html, Item Type=Resistor, Manufacturer Part Number=FRC0402F1152TS
R10: library part RLM10FTSMR006, "500mW 6mΩ ±50ppm/℃ ±1% 0805 Current Sense Resistors / Shunt Resistors ROHS", LCSC Part Number=C163092, Manufacturer="TA-I Tech", Package=0805, ComponentLink1Description=LCSC, ComponentLink1URL=https://www.lcsc.com/product-detail/Current-Sense-Resistors-Shunt-Resistors_TA-I-Tech-RLM10FTSMR006_C163092.html, Item Type=Resistor, Manufacturer Part Number=RLM10FTSMR006
R11 R12 R14 R15 R16: library part RT0402BRD0710KL, "RES SMD 10K OHM 0.1% 1/16W 0402", LCSC Part Number=C190095, Manufacturer=Yageo, Supplier Part Number=1236728, Category="Chip SMD Resistors", ComponentLink1Description=https://datasheet.ciiva.com/12836/pyu-rt-1-to-0-05-rohs-l-4-12836454.pdf?src-supplier=Mouser, ComponentLink1URL=https://datasheet.ciiva.com/12836/pyu-rt-1-to-0-05-rohs-l-4-12836454.pdf?src-supplier=Mouser, Item Type=Resistor, Manufacturer Part Number=RT0402BRD0710KL, Pricing="10000=0.0218, 20000=0.0213, 30000=0.021, 50000=0.0206, 100000=0.0199 (USD)", RoHS=Yes, Stock=490000, Supplier="Future Electronics"
R13: library part RMC04022K1%N, "62.5mW ±1% 2kΩ 0402 Chip Resistor - Surface Mount ROHS", LCSC Part Number=C325372, Manufacturer=TyoHM, ComponentLink1Description=LCSC, ComponentLink1URL=https://www.lcsc.com/product-detail/Chip-Resistor-Surface-Mount_TyoHM-RMC04022K1-N_C325372.html, Item Type=Resistor, Manufacturer Part Number=RMC04022K1%N
U1: "SOT-223 Linear Voltage Regulators (LDO) ROHS", LCSC Part Number=C2992570, Manufacturer="GUOXIN JIAPIN SEMICONDUCTOR", Package=SOT-223, ComponentLink1Description=LCSC, ComponentLink1URL=https://www.lcsc.com/product-detail/Linear-Voltage-Regulators-LDO_GUOXIN-JIAPIN-SEMICONDUCTOR-AMS1117-3-3_C2992570.html, Item Type=IC, Manufacturer Part Number=AMS1117-3.3
U2 U3: "IC REG BCK SPLIT RAIL ADJ 8SOPWR", LCSC Part Number=C31966, Manufacturer="Texas Instruments", Supplier Part Number=595-TPS54560DDAR, ComponentLink1Description=https://datasheet.ciiva.com/15082/tps54560-15082015.pdf?src-supplier=Digikey, ComponentLink1URL=https://datasheet.ciiva.com/15082/tps54560-15082015.pdf?src-supplier=Digikey, ComponentLink2Description=https://datasheet.ciiva.com/30031/tps54560-30031578.pdf?src-supplier=Avnet, ComponentLink2URL=https://datasheet.ciiva.com/30031/tps54560-30031578.pdf?src-supplier=Avnet, ComponentLink3Description=https://datasheet.ciiva.com/29739/tps54560-29739549.pdf?src-supplier=Digikey, ComponentLink3URL=https://datasheet.ciiva.com/29739/tps54560-29739549.pdf?src-supplier=Digikey, Item Type="Voltage Regulators - Switching", Manufacturer Part Number=TPS54560DDAR, Pricing="1=4.48, 10=3.93, 50=3.93, 100=3.6, 1000=2.75, 10000=2.67 (USD)", RoHS=Yes, Stock=12707, Supplier=Mouser
U4: "SMD,12.5x13.2mm WiFi Modules ROHS", LCSC Part Number=C3013922, Manufacturer="Espressif Systems", Package=SMD,12.5x13.2mm, Item Type=IC, Manufacturer Part Number=ESP32-C3-MINI-1U-H4
U5: "IC CURRENT MONITOR SOT25", LCSC Part Number=C154866, Manufacturer=Diodes, ComponentLink1Description=https://datasheet.ciiva.com/1484/1383709-1484867.pdf?src-supplier=Element14, ComponentLink1URL=https://datasheet.ciiva.com/1484/1383709-1484867.pdf?src-supplier=Element14, Item Type=IC, Manufacturer Part Number=ZXCT1086E5TA, Pricing="3000=0.69, 6000=0.665 (USD)", RoHS=Yes, Stock=9000, Supplier="Future Electronics"
U6: "GY-521 6DOF 3 Axis Analog Gyro Sensor + 3 Axis Accelerometer Module", Manufacturer Part Number=MPU6050, Contributor=jofenix, spicePre=U, spiceSymbolName="MPU6050 MODULE", Supplier=Aliexpress
U7: "DIP-8 Real Time Clocks ROHS", LCSC Part Number=C434596, Manufacturer=Maxim, ComponentLink1Description=https://datasheet.ciiva.com/19457/1194695-19457341.pdf?src-supplier=Jameco, ComponentLink1URL=https://datasheet.ciiva.com/19457/1194695-19457341.pdf?src-supplier=Jameco, ComponentLink2Description=https://datasheet.ciiva.com/30480/0900766b81253c0a-30480875.pdf?src-supplier=Rs, ComponentLink2URL=https://datasheet.ciiva.com/30480/0900766b81253c0a-30480875.pdf?src-supplier=Rs, ComponentLink3Description=https://datasheet.ciiva.com/1240/ds1307-1240473.pdf?src-supplier=Digikey, ComponentLink3URL=https://datasheet.ciiva.com/1240/ds1307-1240473.pdf?src-supplier=Digikey, ComponentLink4Description=https://datasheet.ciiva.com/3304/ds1307-3304456.pdf?src-supplier=Avnet, ComponentLink4URL=https://datasheet.ciiva.com/3304/ds1307-3304456.pdf?src-supplier=Avnet, Item Type=IC, Manufacturer Part Number=DS1307N, Pricing="1=6.11, 10=4.06, 50=4.06, 100=3.42, 1000=2.77, 10000=2.6 (USD)", RoHS=Yes, Stock=754, Supplier=Mouser
X1: library part "DT-26 32.768KHz", "DT-26 Crystals ROHS", LCSC Part Number=C93229, Manufacturer="KDS Daishinku", Package=DT-26, ComponentLink1Description=LCSC, ComponentLink1URL=https://www.lcsc.com/product-detail/Crystals_KDS-Daishinku-DT-26-32-768KHz_C93229.html, Item Type=Crystal, Manufacturer Part Number="DT-26 32.768KHz"

## Via types
v1: diameter 23.62, hole 11.81, Top Layer to Bottom Layer, tented both sides, 68 vias
v2: diameter 23.62, hole 11.81, Top Layer to Bottom Layer, 54 vias

## Nets (pads, with @x,y where several pads share a name; then routed paths per layer and width w, separated by ;. In a path a pad name is that pad's centre, name@x,y a point inside that pad or via, vN(x,y) a via of type N, cw(c..) or ccw(c..) an arc to the next point about the centre after c; other vN are vias at no path point)
3V3: C1.1 C18.1 C19.1 C20.2 J14.4 R12.1 R14.2 R15.2 R16.2 U1.2 U1.4 U4.3 U5.5 U6.1 | length 4688.4
  Top Layer w12: 474.92,1139.7 485.92,1128.7 509.92,1128.7 509.92,1128.1 509.47,1127.66 ; R15.2 R16.2 897.11,1483.89 897.11,1466.7
  Top Layer w20: C18.1@472.92,1195.7 472.92,1305.7 493.22,1326 681.22,1326 699.92,1344.7 v1(699.92,1415.7)
  Top Layer w50: 869.92,1633.7 869.92,1796.7 809.92,1856.7 212.92,1856.7 111,1958.62 111,2530 223,2642 880.22,2642 956.92,2718.7 U6.1
  Bottom Layer w20: J14.4 683.26,1432.37 v1(699.92,1415.7)
  Bottom Layer w50: C1.1@887.45,3954.24 996.92,3844.77 996.92,3316.7 943.92,3263.7 813.92,3263.7 759.92,3209.7 759.92,3050.7 U6.1
  other v1: 934.44,4456.22 933.92,4492.7
8V4: C7.2 C8.2 C9.2 C13.2 C14.2 J3.1 J4.2 J9.1 J10.1 L1.2 R1.1 R2.2 U3.2 | length 3148.4
  Top Layer w50: J10.1 v1(580.92,3423.7) 718.92,3285.7 718.92,3145.08 780.3,3083.7 J3.1 868.49,3228.28 914.91,3274.69 J9.1
  Bottom Layer w50: J3.1 1127,2825.2 1127,1136.78 1082.71,1092.49 J4.2
  other v2: 288.52,3932 330.22,3932 371.91,3932 413.6,3932 455.3,3932 496.99,3932 538.69,3932 580.38,3932 288,3968.48 329.69,3968.48 371.39,3968.48 413.08,3968.48 454.78,3968.48 580.9,3968.48
A10: J5.11 J13.3 | length 1598.6
  Top Layer w12: J5.11 379,5085.62 v1(379,4622)
  Bottom Layer w12: J13.3 179.92,3815.7 179.92,4422.92 v1(379,4622)
A11: J5.10 J11.3 | length 2190.2
  Top Layer w12: J5.10 63.92,5064.7 63.92,3901.08 111.49,3853.51 600.1,3853.51 J11.3
B11: J5.9 J10.3 | length 2187
  Top Layer w12: J5.9 426,5238.62 v1(426,4686)
  Bottom Layer w12: J10.3 160.92,3519.7 160.92,4452.92 394,4686 v1(426,4686)
CS: J14.2 U4.21 | length 209.7
  Top Layer w12: v1@726.92,1591.7 727.55,1591.7 728.81,1590.44 U4.21
  Bottom Layer w12: J14.2 691.2,1518.98 726.92,1554.7 v1(726.92,1590.7)
CUR_SENSE: U4.18 U5.1 | length 3461
  Top Layer w12: v1(729.92,1495.7) 730.17,1495.95 U4.18 ; U5.1 963.32,4554.3 v1(963.92,4553.7) ; v1@1060.92,2077 v1@1063.14,2079.22 ; v1(1065.92,2077) v1(1065.92,4324)
  Bottom Layer w12: v1(729.92,1495.7) 760.92,1526.7 760.92,1691.92 820,1751 1020,1751 1065.92,1796.92 v1(1065.92,2077) ; v1(963.92,4553.7) 1018.3,4553.7 1065.92,4506.08 v1(1065.92,4324)
D9: J5.8 J9.3 | length 2706.3
  Top Layer w12: J5.8 44.92,5245.7 44.92,3886.08 103.92,3827.08 518.92,3827.08 679.3,3666.7 v1(715.92,3666.7)
  Bottom Layer w12: J9.3 714.91,3666.71 712.92,3668.7 713.92,3668.7 v1(715.92,3666.7)
G11: J5.2 J7.3 | length 3273.4
  Top Layer w12: J5.2 494.92,6082.7 643.92,5933.7 643.92,4882.08 717,4809 994,4809 v1(1149,4654)
  Bottom Layer w12: J7.3 1067,3558.62 1067,3828.78 1149,3910.78 v1(1149,4654)
GND: C1.2 C3.1 C4.1 C5.1 C6.1 C7.1 C8.1 C9.1 C10.1 C11.1 C13.1 C14.1 C15.1 C16.1 C17.1 C18.2 C19.2 C20.1 C21.1 C22.1 D1.2 D2.2 J1.2 J2.2 J3.2 J5.1 J6.2 J7.2 J8.3 J8.6 J8.9 J8.12 J8.15 J8.18 J9.2 J10.2 J11.2 J12.5 J12.S1 J12.S2 J12.S3 J12.S4 J13.2 J14.6 J14.MP1 J14.MP2 J14.MP3 J14.MP4 J15.1 LED1.2 R4.1 R5.1 R8.1 R9.1 R13.1 U1.1 U2.7 U2.9 U3.7 U3.9 U4.1 U4.2 U4.11 U4.14 U4.36 U4.37 U4.38 U4.39 U4.40 U4.41 U4.42 U4.43 U4.44 U4.45 U4.46 U4.47 U4.48 U4.49 U4.50 U4.51 U4.52 U4.53 U5.2 U6.2 U7.4 | length 847.7
  Top Layer w12: v1@925.92,4554.3 U5.2
  Top Layer w18: v1(148,847) J12.5@202.6,847
  Top Layer w25: LED1.2 v1(199.26,4764.74) ; C5.1 C6.1 ; C20.1 1010.92,4582.92 v1(1011,4583)
  Top Layer w50: J8.3 J8.6 J8.9 J8.12 J8.15 J8.18
  Bottom Layer w25: C13.1 C14.1 ; v1(980,4155) 980,4096.62 U1.1
  other v1: 701,161.32 701,195.32 449,404.32 485.48,404.58 449,443.94 485.48,444.2 449,483.82 485.48,484.08 449,523.44 485.48,523.96 449,563.32 485.48,563.84 549.92,981.7 404.92,1160.7 404.92,1195.26 803.92,1255.7 551.92,1479.7 550.92,1511.7 822.4,3892.83 742.4,3893.83 782.4,3893.83 822.92,3929.31 742.92,3930.31 782.92,3930.31 293,4428 327,4428 926.52,4553.7
  other v2: 899,235.41 945.8,235.41 992.6,235.41 1039.4,235.41 1086.2,235.41 1133,235.41 648,362.32 698,362.32 748,362.32 798,362.32 899,412 945.8,412 992.6,412 1039.4,412 1086.2,412 1133,412 647,436.32 696,436.32 747,436.32 796,436.32 539,4192 578.62,4192 618.5,4192 658.12,4192 698,4192 539.26,4228.48 579.14,4228.48 618.76,4228.48 658.64,4228.48 698.52,4228.48 619.02,4264.96 619.28,4301.44 568,4373 494,4374 568,4422 494,4424 568,4473 494,4474 568,4522 494,4524
H13: J6.5 J8.1 | length 4687
  Bottom Layer w12: J8.1 228.92,1988.7 137.92,2079.7 137.92,4464.92 388,4715 937,4715 1041.92,4819.92 1041.92,5622.72 J6.5
J11: J6.8 U6.3 | length 3820.9
  Top Layer w12: J6.8 v1(1085.11,5482.7)
  Bottom Layer w12: U6.3 710.92,2899.7 710.92,3209.7 538.92,3381.7 538.92,3802.7 478.62,3863 273,3863 224,3912 224,4397 498,4671 958,4671 1110.92,4823.92 1110.92,5456.89 v1(1085.11,5482.7)
J12: J6.10 J8.10 | length 4682.6
  Bottom Layer w12: J8.10 498.92,1865.7 199.98,1865.7 69.92,1995.76 69.92,4497 355.92,4783 913,4783 973.92,4843.92 973.92,5190.72 J6.10
J13: J6.6 J8.4 | length 4801.3
  Bottom Layer w12: J8.4 346.92,1913.7 219.86,1913.7 117.92,2015.64 117.92,4478.92 375,4736 929,4736 1021.92,4828.92 1021.92,5542.72 J6.6
K10: J6.11 J8.13 | length 4717.2
  Bottom Layer w12: J8.13 576.92,1843.7 190.87,1843.7 47.92,1986.65 47.92,4508.92 345,4806 903.05,4806 948.92,4851.87 948.92,5115.72 J6.11
K11: J6.9 U6.4 | length 3680.2
  Top Layer w12: J6.9 1074.92,5382.7 v1(1075.92,5383.7)
  Bottom Layer w12: U6.4 655.92,2854.7 655.92,2961.7 683.92,2989.7 683.92,3196.7 513.92,3366.7 513.92,3792.35 463.27,3843 264,3843 204,3903 204,4404 494,4694 950,4694 1075.92,4819.92 v1(1075.92,5383.7)
L13: J6.7 J8.7 | length 4842.2
  Bottom Layer w12: J8.7 422.92,1889.7 209.92,1889.7 93.92,2005.7 93.92,4487.92 365,4759 921,4759 997.92,4835.92 997.92,5466.72 J6.7